# Altium PCB Left-PCB-v1.0.PcbDoc (part 2 of 2)
Units mil, origin at the board's own origin, x right, y up, seen from the top; angles counter-clockwise.
Board outline 1062.99 x 944.88 mil, 4 copper layers (Top Layer, GND, PWR, Bottom Layer), stack 45.118 mil thick; 85 components, 60 nets, 287 pads, 140 vias.
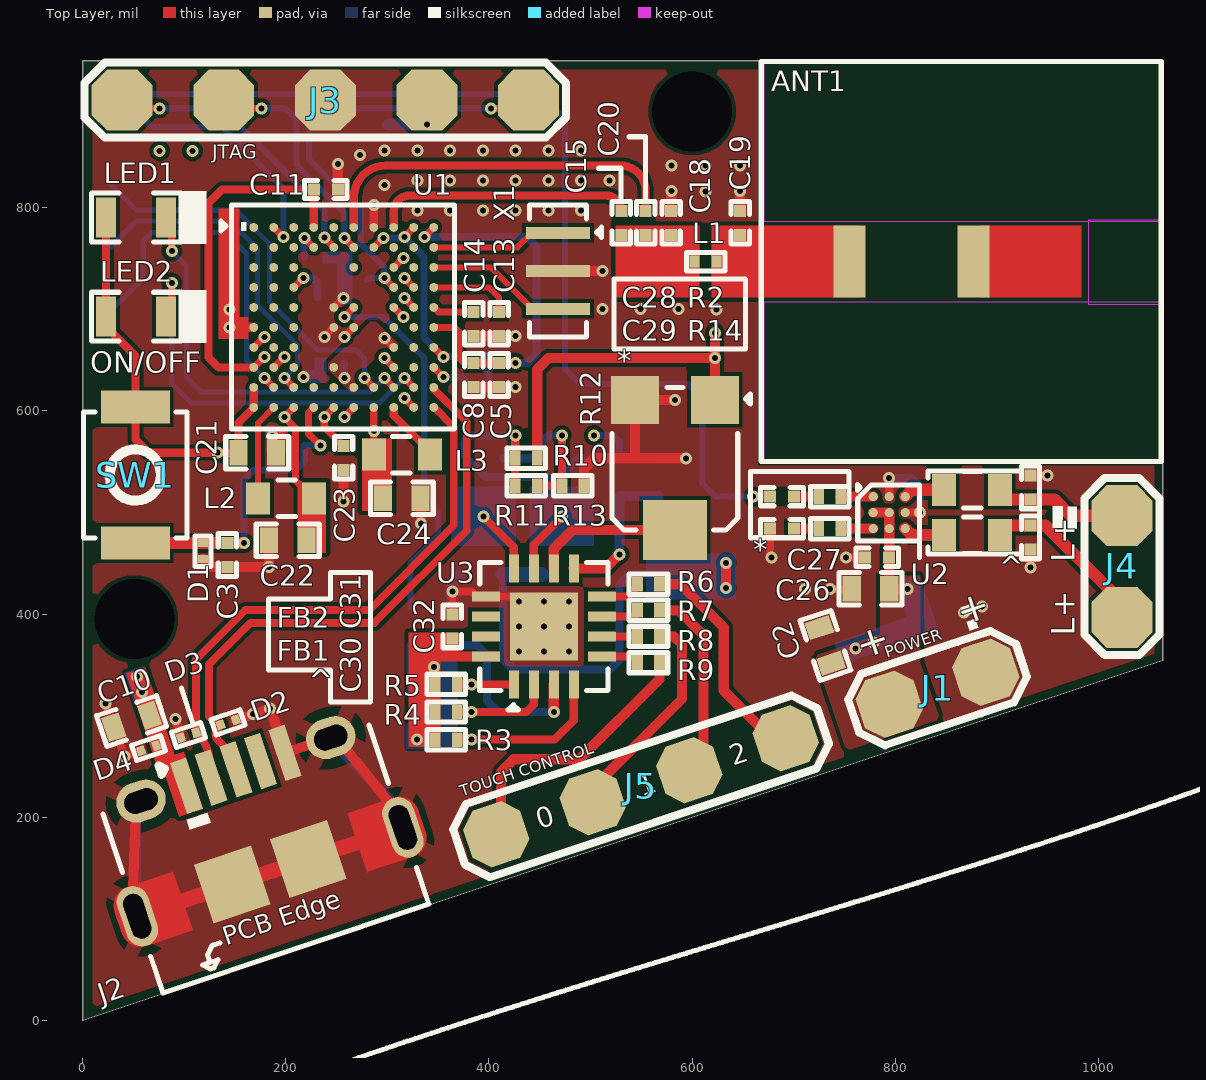
[diagram p0: Top Layer view]

## Via types
v1: diameter 11.81, hole 5.91, Top Layer to Bottom Layer, tented both sides, 140 vias

## Nets (pads, with @x,y where several pads share a name; then routed paths per layer and width w, separated by ;. In a path a pad name is that pad's centre, name@x,y a point inside that pad or via, vN(x,y) a via of type N, cw(c..) or ccw(c..) an arc to the next point about the centre after c; other vN are vias at no path point) (continued)
EASY_TUNE: (continued)
  Bottom Layer w6: v1(257.62,692.5) 295.98,692.5 336.36,652.13 336.36,513.85 350,500.21 350,477.51 323,450.51 SB6.1
GND: C1.2 C2.2 C3.1 C4.1 C5.1 C6.1 C7.2 C8.1 C9.2 C10.2 C11.1 C12.2 C13.2 C14.2 C16.2 C17.1 C18.1 C19.1 C21.1 C22.1 C23.1 C24.1 C25.1 C26.1 C27.1 C29.1 C30.1 C31.1 C32.2 D1.1 D2.1 D3.1 D4.1 J1.2 J2.5 J2.MP1 J2.MP2 J2.S1 J2.S2 J2.S3 J2.S4 J3.3 R1.2 R12.3 R13.2 SB2.1 SB4.1 SB10.2 SB14.2 U1.A7 U1.E5 U1.F5 U1.F6 U2.A2 U2.B3 U3.13 U3.17 X1.2 | length 2266.1
  Top Layer w6: U1.F5 U1.F5@247.32,682.48 ; U1.E5@247.32,701.6 U1.E5
  Top Layer w7: v1(237.93,672.82) U1.F5 ; U1.E5 v1(256.7,711.26) ; v1(257.62,672.82) U1.F6
  Top Layer w8: v1(22.63,312.04) 27.77,296.69 C10.2 34.31,280.95 v1(41.3,260.04) D4.1@57.75,265.12 ; v1(91.48,296.99) D3.1 ; U1.A7 v1(286.69,802.88) ; C32.2 v1(364,422.33) 383.13,422.33 388.06,417.41 U3.13 424.47,417.41 v1(429.39,412.49) ; C29.1 676.69,458.25 678.02,456.91 v1(678.02,455.88) ; v1(735.48,424.88) C26.1 ; v1(751.62,455.88) C27.1 ; U2.A2 v1(794,534.15) ; U2.B3 v1(824.31,499.88) ; J1.2@878.77,353.12 J1.2
  Top Layer w10: J2.S4 49.31,116.67 52.93,214.4 J2.S1 ; D1.1 126.4,446.4 C3.1 v1(183.5,446.4) C22.1 ; D2.1 v1(167.65,301.46) v1(184.53,306.91) ; v1@185.01,306.67 192.63,283.9 J2.5 202.57,264.47 239.61,276.87 J2.S2 248.94,279.99 310.65,204.11 J2.S3 ; C11.1 v1(251.25,842.88) ; v1(257,510.88) C23.1 ; v1(333.12,488.97) C24.1@333.12,514.04 ; C8.1 C5.1 v1(426,623.54) ; C14.2 C13.2 v1(426,673.93) ; X1.2 v1(512,737.88) ; R13.2 493.49,543.14 503.73,553.38 543.63,553.38 ; C18.1 579.48,797.22 579.48,816.19 v1(579.68,816.39) ; v1(583,610.86) R12.3 543.63,553.38 ; v1(594,553.38) 543.63,553.38 ; C19.1 v1(647.28,816.39) ; v1(933,445.88) C30.1 ; C31.1 v1(949.99,536.5)
  Top Layer w15: J2.S4 J2.MP1 J2.MP2 J2.S3
  Bottom Layer w7: v1(187.21,575.26) R1.2 ; C1.2 C17.1
  Bottom Layer w8: v1(794,534.15) 815.73,534.15 824.31,525.57 v1(824.31,499.88)
  Bottom Layer w10: J2.S1 52.67,211.04 52.67,103.99 J2.S4 J2.S3 315.34,204.95 244.27,276.01 J2.S2 ; v1(251.25,842.88) v1@251.25,843.37 ; SB2.1 v1(594,553.38)
  Bottom Layer w12: SB4.1 364,407.88 v1(364,422.33) 364,431.58 SB10.2@371.5,439.08
  other v1: 429.39,363.28 454,363.28 478.61,363.28 429.39,387.88 454,387.88 478.61,387.88 867.51,401.74 885.37,407.42 454,412.49 478.61,412.49 710.87,424.88 217.3,633.47 549.25,700.32 586.65,700.17 624.05,700.01 511.84,700.48 329.62,797.07 361.84,797.07 394.06,797.07 426.28,797.07 458.51,797.07 490.73,797.07 613.08,816.19 297.39,822.24 329.62,826.88 361.84,826.88 394.06,826.88 426.28,826.88 458.51,826.88 490.73,826.88 518.85,826.88 579.68,841.62 613.28,841.62 647.28,841.62 273.04,851.72 297.39,856.36 329.62,856.36 361.84,856.36 394.06,856.36 426.28,856.36 458.51,856.36 490.73,856.36
LDO31_VO: C9.1 C23.2 C25.2 J3.2 U1.C8 U1.D3 U1.H8 U1.K5 | length 158.2
  Top Layer w7: U1.D3 v1(217.33,730.95) ; U1.K5 v1(237.93,594.08) 237.93,584.39 254.22,568.1 254.6,568.1 256.63,566.07 C23.2@256.63,565.69 ; v1(296.99,652.21) U1.H8 ; U1.C8 v1(315.75,750.63)
  Bottom Layer w7: v1(217.33,730.95) 226.9,730.95 231,726.85 C9.1
  Bottom Layer w12: C25.2 v1(339,881.88)
LED1: LED1.2 U1.J8 | length 385.1
  Top Layer w7: LED1.2 87.83,784.81 v1(87.83,757.16) ; v1(296.99,632.52) U1.J8
  Bottom Layer w5: v1(87.83,757.16) 102.37,742.62 102.37,633.23 116.96,618.63 283.1,618.63 v1(296.99,632.52)
LED2: LED2.2 U1.J9 | length 394.6
  Top Layer w7: LED2.2 87.83,698.33 v1(87.83,725.98) ; v1(316.67,632.52) U1.J9
  Bottom Layer w5: v1(87.83,725.98) 87.83,627.05 107,607.88 292.03,607.88 v1(316.67,632.52)
MFB: C3.2 D1.2 R1.1 SW1.2 U1.K4 | length 311.8
  Top Layer w7: U1.K4 222.52,598.35 222.52,577.45 v1(234.1,565.88)
  Top Layer w12: SW1.2 C3.2 v1(158.93,470.02)
  Bottom Layer w7: v1(158.93,470.02) 158.93,532.44 168.27,541.77 209.34,541.77 218.25,550.68 R1.1 v1(234.1,565.88)
NetANT1_1: ANT1.1 C19.2 L1.2
NetC12_1: C12.1 U1.B4 | length 32.7
  Top Layer w7: v1(218.25,770.32) U1.B4
  Bottom Layer w7: C12.1 v1(218.25,770.32)
NetC13_1: C13.1 U1.D10 | length 82.3
  Top Layer w6: U1.D10 399.76,721.57 410,711.33 C13.1
NetC14_1: C14.1 U1.E10 | length 41.1
  Top Layer w7: U1.E10 346.19,701.88 350.52,697.55 C14.1
NetC15_2: C15.2 C18.2 C20.2 L1.1
NetC28_2: C28.2 R2.1 | length 24.3
  Top Layer w10: C28.2 R2.1
NetC29_2: C29.2 R14.1 | length 24.3
  Top Layer w10: C29.2 R14.1
NetFB1_1: FB1.1 U2.C3 | length 40.6
  Top Layer w12: U2.C3 816.1,477.79 FB1.1
NetFB2_1: FB2.1 U2.A3 | length 40.8
  Top Layer w12: U2.A3 816.46,522.34 FB2.1
NetP1_1: P1.1 U1.J7 | length 387.3
  Top Layer w7: v1(277.3,632.52) U1.J7
  Bottom Layer w5: P1.1 53.07,797.5 151.06,797.5 183.91,764.66 183.91,707.62 231.64,659.88 269.07,659.88 277.3,651.65 v1(277.3,632.52)
NetP2_1: P2.1 U1.J3 | length 329.6
  Top Layer w7: v1(198.56,632.52) U1.J3
  Bottom Layer w5: P2.1 53.07,786.95 145.04,786.95 172.33,759.66 172.33,703.94 211.74,664.53 211.74,645.7 v1(198.56,632.52)
NetP3_1: P3.1 U1.J2 | length 339.4
  Top Layer w7: v1(178.88,632.52) U1.J2
  Bottom Layer w5: P3.1 60.08,731.28 60.08,767.71 68.09,775.72 140.6,775.72 161.35,754.98 161.35,650.06 v1(178.88,632.52)
NetR2_2: R2.2 U2.A1 | length 31.9
  Top Layer w10: R2.2 U2.A1
NetR6_1: R6.1 U3.8 | length 41.2
  Top Layer w8: U3.8 536.11,417.41 546.17,427.47 R6.1
NetR7_2: R7.2 U3.7 | length 38.7
  Top Layer w8: U3.7 542.14,397.73 546.17,401.76 R7.2
NetR8_2: R8.2 U3.6 | length 35.1
  Top Layer w8: U3.6 R8.2
NetR9_2: R9.2 U3.5 | length 38.8
  Top Layer w8: U3.5 542.06,358.36 546.17,354.24 R9.2
NetR14_2: R14.2 U2.C1 | length 31.9
  Top Layer w10: R14.2 U2.C1
NetSB1_2: SB1.2 SB2.2 SB5.2 U3.9 | length 185.1
  Top Layer w10: U3.9 514.61,444.97 v1(528.53,458.88)
  Bottom Layer w10: v1(528.53,458.88) SB5.2 SB2.2 SB1.2@567,478
NetSB3_2: SB3.2 SB4.2 SB6.2 U3.3 | length 269.2
  Top Layer w10: v1(463.84,303.61) U3.3
  Bottom Layer w8: SB3.2 SB6.2 SB4.2 388.63,369.38 398.28,359.73 398.28,314.67 409.33,303.61 v1(463.84,303.61)
OUT_0: R3.1 U1.E8 U3.4 | length 701.1
  Top Layer w7: U1.E8 v1(315.75,692.5)
  Top Layer w8: R3.1 464.49,276.43 483.53,295.47 U3.4
  PWR w7: v1(315.75,692.5) 400.5,692.5 411,682 411,466.89 383,438.89 383,353.88 367,337.88 367,292.43 v1(383,276.43)
OUT_1: R4.1 U1.D9 U3.2 | length 696
  Top Layer w7: v1(316.67,730.95) U1.D9
  Top Layer w8: R4.1 436.73,303.61 444.16,311.04 U3.2
  PWR w7: v1(316.67,730.95) 433.27,730.95 457.3,706.91 457.3,470.64 413.93,427.26 413.93,334.55 v1(383,303.61)
OUT_2: R5.1 U1.E9 U3.1 | length 588.9
  Top Layer w7: v1(316.67,711.26) U1.E9
  Top Layer w8: R5.1 U3.1
  PWR w7: v1(316.67,711.26) 421.84,711.26 444,689.1 444,479.02 399.48,434.49 399.48,347.27 v1(383,330.8)
OUT_L+: C30.2 FB1.2 J4.1 | length 172.6
  Top Layer w12: FB1.2 902.89,481.53 908.7,487.34 947.66,487.34 1010.49,424.51 1010.49,409.4 J4.1
OUT_L-: C31.2 FB2.2 J4.2 | length 132.8
  Top Layer w12: FB2.2 902.89,518.69 908.7,512.88 956.58,512.88 972.58,496.88 J4.2
PA1OP: C20.1 U1.A6 | length 368.4
  Top Layer w8: U1.A6 267,809.88 cw(c298.74,809.88) 298.74,841.62 529.05,841.62 cw(c529.05,816.39) 554.28,816.39 C20.1
RST_N: C16.1 J3.1 U1.D8 | length 441.6
  Top Layer w6: v1(402,897.88) 431,897.88 J3.1
  Top Layer w7: v1(296.99,730.95) U1.D8
  Bottom Layer w6: C16.1 282.07,730.95 v1(296.99,730.95) 296.99,741.49 273.82,764.66 273.82,797.07 222.93,847.95 222.93,886.85 233.97,897.88 v1(402,897.88)
RTX: C15.1 U1.A8 | length 257.3
  Top Layer w8: U1.A8 306.37,796.62 cw(c321.72,796.62) 321.72,811.98 515.32,811.98 cw(c515.32,797.02) C15.1 C15.1@530.38,797.02
SINGLE_BUTTON: SB5.1 U1.H2 | length 907.7
  Top Layer w7: U1.H2 v1(198.59,653.15)
  PWR w7: v1(198.59,653.15) 198.59,744.03 177.02,765.6 177.02,872.12 203.33,898.42 362.5,898.42 382.6,878.32 458.29,878.32 474.55,862.06 474.55,604.84 v1(503.5,575.88)
  Bottom Layer w7: v1(503.5,575.88) 521.82,575.88 528.53,569.17 SB5.1
SYS_PWR: C21.2 LED1.1 LED2.1 SW1.1 U1.J1 U1.K1 U1.K6 U1.K9 | length 434.3
  Top Layer w7: v1(257.62,594.08) U1.K6 ; v1(316.67,612.84) U1.K9
  Top Layer w8: LED1.1 LED2.1 23.27,682.97 52,654.24 SW1.1 52,571.79 64.91,558.88 v1(133,558.88) C21.2 153.5,588.38 U1.K1 U1.J1
USB_D_N: D3.2 J2.2 U1.K10 | length 548.5
  Top Layer w7.62: D3.2 111.76,299.77 111.76,355.69 160.05,403.98 282.07,403.98 365.47,487.38 365.47,584.01 U1.K10@346.02,603.46 ; D3.2@115.02,280.27 cw(c85.2,253.33) 125.16,257.63 J2.2
USB_D_P: D2.2 J2.3 U1.J10 | length 575.2
  Top Layer w7.62: D2.2@133.29,287.19 ccw(c138.89,281.59) 130.98,282.01 130.98,281.89 ccw(c138.59,281.63) 130.97,281.46 130.98,281.17 ccw(c138.89,281.59) 131.52,278.7 cw(c85.2,253.33) 132.33,277.15 ccw(c138.89,281.59) 133.29,275.99 141.3,267.98 J2.3 ; D2.2 135.84,291.24 134.42,292.66 131.49,292.66 124.38,299.77 124.38,350.46 165.28,391.36 287.29,391.36 378.09,482.15 378.09,589.24 345.94,621.39 345.94,622.94 U1.J10
V_USB: C10.1 D4.2 J2.1 U1.F1 | length 64.1
  Top Layer w8: v1(144.5,682.2) U1.F1
  Top Layer w10: v1(53.41,338.5) v1(58.55,323.33) C10.1
  other v1: 144.5,699.88
VBAT: C2.1 C26.2 C27.2 C32.1 J1.1 R3.2 R4.2 R5.2 R10.1 R12.1 SB1.1 SB3.1 SB7.2 SB11.2 U1.G1 U2.B1 U2.B2 U2.C2 U3.16 | length 843
  Top Layer w7: U1.G1@169.02,662.51 U1.G1 v1(178.9,672.84)
  Top Layer w10: R10.1 447.58,640.87 458.92,652.21 v1(622.37,652.21) ; R12.1 v1(622.37,652.21) ; v1(622.37,676.81) v1(622.37,652.21) ; v1(633.42,425.77) v1(633.42,450.37) ; U2.B1 U2.B2 U2.C2 C27.2 794,424.99 C26.2 v1(812.08,424.88)
  Bottom Layer w8: SB7.2 414,355.39 424.02,345.37 519.31,345.37 528.53,354.58 528.53,429.08 538.52,439.08 SB1.1
  Bottom Layer w15: SB7.2 SB11.2
  other v1: 329.2,276.43 345.87,347.88 760.64,366.34 778.49,372.02 76,855.88 108.22,855.88
VCC_RF: C5.2 C8.2 U1.A10 U1.F10 | length 368.3
  Top Layer w4: v1@336,770.88 v1(336.36,771.24)
  Top Layer w6: C8.2@383.54,648.62 C8.2
  Top Layer w7: v1(336.36,771.24) U1.A10 ; U1.F10 365.83,682.2 370.41,677.62 370.41,652.14 373.92,648.62 C8.2@383.54,648.62
  Top Layer w8: C8.2 C5.2 v1(426,647.16)
  Bottom Layer w8: v1(336.36,771.24) 437.4,771.24 446.85,761.79 446.85,655.74 438.27,647.16 v1(426,647.16)
XO_N: U1.C10 X1.3 | length 139.3
  Top Layer w6: U1.C10 401.91,741.25 439.5,703.66 439.5,703.39 442.41,700.48 X1.3
XO_P: U1.B10 X1.1 | length 128.2
  Top Layer w6: U1.B10 428.06,760.94 442.41,775.28 X1.1
pads on no net: ANT1.2 J2.4 U1.A1 U1.A3 U1.A5 U1.B1 U1.B2 U1.B3 U1.B8 U1.B9 U1.C1 U1.C2 U1.C3 U1.C6 U1.C9 U1.D1 U1.D2 U1.E1 U1.E2 U1.E3 U1.F2 U1.F3 U1.F8 U1.F9 U1.G2 U1.G3 U1.G9 U1.H3 U1.H9 U1.J4 U1.J5 U3.14 U3.15

## Polygon pours and split planes (outlines as drawn)
1V5 on PWR "1V5_L03_P003" (solid, pour order 3): 347.12,424 399,475.88 399,680.88 349,680.88 349,644.88 372,644.88 372,552.88 307.12,488 141.88,488 118,511.88 118,577.88 127,586.88 205,586.88 205,599.88 110,599.88 95,584.88 95,494 165,424
SYS_PWR on PWR "SYS_PWR_L03_P001" (solid, pour order 1): 199,563.91 199,534.88 290,534.88 308,552.88 308,603.88 266,603.88 266,586.88 250,586.88 250,621.88 365,621.88 365,557.88 302.12,495 143.88,495 124,514.88 124,574.63 131.25,581.88 173.82,581.88 173.82,563.91
VBAT on PWR "VBAT_L03_P006" (solid, remove dead copper, pour order 6): 664.35,937.88 664.35,546.01 1055,546.01 1055,361.22 10,12.88 10,937.88
LDO31_VO on PWR "LDO31_VO_L03_P005" (solid, pour order 5): 241,832.88 276,832.88 276,798.88 282,792.88 286,792.88 286,760.41 330,760.41 330,742.88 285,742.88 285,658.88 319,658.88 319,643.88 250.79,643.88 245,638.1 245,586.88 228.38,586.88 228.38,643.88 209,643.88 209,758.88 267.52,758.88 267.52,781.44 188,781.44 188,866.88 211.07,889.95 348.58,889.95 348.58,866.27 250.39,866.27 241,856.88
V_USB on PWR "V_USB_L03_P000" (solid, pour order 0): 10,270.62 10,710.88 153,710.88 153,669.88 134.5,669.88 134.5,604.88 104,604.88 87.83,588.72 87.83,491.17 155,424 155,270.62
1V8 on PWR "1V8_L03_P002" (solid, pour order 2): 274,596.88 300,596.88 300,556.88 285,541.88 209,541.88 209,604.88 143,604.88 143,661.88 188,661.88 188,644.88 165,644.88 165,621.88 224,621.88 224,581.88 274,581.88
1V2 on PWR "1V2_L03_P008" (solid, pour order 8): 290,663.88 290,715 305,715 305,680.88 343,680.88 343,640.1 365,640.1 365,626.88 327,626.88 327,663.88
GND on Top Layer "GND_L01_P007" (solid, remove dead copper, pour order 7): 664.35,935.88 664.35,546.01 1055,546.01 1055,361.22 10,12.88 10,935.88
1V2 on Top Layer "1V2_L01_P009" (solid, pour order 9): 242,646.88 242,640.34 252.44,629.89 266.16,616.18 273.93,623.95 267,630.88 299.5,663.38 305.79,657.09 312.79,664.09 289,687.88 283,687.88
VBAT on Top Layer "VBAT_L01_P004" (solid, pour order 4): 785.11,380.3 720.56,359.31 751.77,265.47 844.02,296.52 824.75,352.29 824.31,437.88 785.11,437.88
GND on GND "GND_L02_P010" (solid, pour order 10): 664.35,934.88 664.35,546.01 1055,546.01 1055,361.22 10,12.88 10,934.88
VBAT on Bottom Layer "VBAT_L04_P011" (solid, pour order 11): 152,808.8 152,848.76 131.56,869.2 64.3,869.2 53,880.5 53,909.29 63.14,919.43 459.09,919.43 528.77,849.75 528.77,635.88 640,635.88 640,799.29 570.33,799.29 570.25,799.2 570.25,916.64 549.01,937.88 10,937.88 10,849.88 41,849.88 54.69,836.19 54.69,808.8
GND on Bottom Layer "GND_L04_P012" (solid, pour order 12): 664.35,934.88 664.35,546.01 1055,546.01 1055,361.22 10,12.88 10,934.88

## Other copper
Top Layer:
  rectangle net V_USB: 134,670.88 163.12,692.5
  region net V_USB: 75.53,243.38 94.61,249.76 61.7,348.11 42.62,341.73
  rectangle net V_USB: 134,677.76 170.13,686.87
  rectangle net VBAT: 321.1,269.15 352.58,285.11
  rectangle net V_USB: 134,670.88 154.72,799.3
  rectangle net 1V5: 211.5,460.38 239.84,529.79
  region net NetC15_2: 607.38,782.32 524.38,782.32 524.38,711.45 607.38,711.45
  rectangle net NetANT1_1: 619.19,711.45 762.56,782.32
  rectangle net GND: 181.5,546.38 199.5,581.59
  region net V_USB: 95.07,200.48 109.48,205.3 72.49,315.87 58.07,311.04
  region net V_USB: 98.15,201.51 118.67,208.38 99.79,264.82 79.27,257.95
  rectangle net 1V8: 274.87,501.54 304.74,572.63
  rectangle net VBAT: 341.95,353.43 410.69,363.28
  rectangle net VBAT: 339,353.43 369.91,381.98
  rectangle net VBAT: 320.77,269.15 352.58,381.98
Bottom Layer:
  region net VBAT: 819.05,375.96 842.76,384.42 823.15,439.36 799.43,430.89
  region net VBAT: 747.31,349.68 842.76,384.42 834.9,406.04 739.44,371.29
  region net V_USB: 51.82,309.15 72.16,315.96 60.96,349.46 40.61,342.66
  rectangle net VBAT: 317.68,266.53 369,292.5
  rectangle net VBAT: 554.5,414.55 643.39,459.88
  rectangle net V_USB: 134,670.88 154.72,710.74
  rectangle net GND: 217,627.34 239.9,640.04
  rectangle net GND: 228.09,627.34 239.9,652.79
  rectangle net VBAT: 339.52,266.53 369,354.55
  rectangle net GND: 235.97,744.98 265.72,756.79
  rectangle net GND: 250.47,704.94 265.72,756.79
  rectangle net GND: 180.7,558.6 201.91,581.43
  rectangle net CFG0: 362.5,467.08 426.5,525.38
  rectangle net CFG1: 439.83,467.08 503.63,525.38

## Silkscreen, mask and mechanical layers (free items; w line width, h text height)
Top Overlay:
  drawing of 1398 lines, arcs and shapes, not listed
  text "JTAG" at 127.68,843.06 h23.62
  text "*" at 526.22,631.93 h35.43
  text "ON/OFF" at 7.52,630.53 h35.43
  text "TRANSDUCER" at 1300.49,465.45 h45 r90
  text "L+" at 984.5,450.94 h39.37 r90
  text "*" at 660.39,446.2 h35.43
  text "^" at 902.54,429.97 h35.43
  text "+" at 868.43,378.76 h49.21 r18.4
  text "L+" at 984.5,378.94 h39.37 r90
  text "POWER" at 793,353.33 h19.68 r18.4
  text "+" at 769.45,345.68 h49.21 r18.4
  text "^" at 222.54,317.97 h35.43
  text "2" at 640.62,250.75 h19.68 r18.4
  text "1" at 550.28,220.43 h19.68 r18.4
  text "TOUCH CONTROL" at 374.91,216.14 h19.68 r18.4
  text "0" at 449.92,188.13 h19.68 r18.4
  text "BATTERY" at 3239.87,93.87 h45
Bottom Overlay:
  lines w5: 359,581.88 412,581.88 412,567.88 ; 378.5,356.88 391.94,343.45
  text "RTS" at 126.57,807.11 h35.43
  text "TXD" at 121.57,749.53 h35.43
  text "RXD" at 123.52,686.88 h35.43
  text "Rev-v1.0 (LEFT)" at 910.98,326.41 h39.37 r18
Board Outline:
  the board outline again, w5
Fabrication:
  drawing of 295 lines, arcs and shapes, not listed
  text "Layer" at 4397.58,1223 h60
  text "Name" at 4807.49,1223 h60
  text "Material" at 5737.23,1223 h60
  text "Thickness" at 6597,1223 h60
  text "Constant" at 7246.84,1223 h60
  text "Board Layer Stack" at 7816.7,1223 h60
  text "Top Overlay" at 4807.49,1103 h60
  text "Top Solder" at 4807.49,983 h60
  text "Solder Resist" at 5737.23,983 h60
  text "1.20mil" at 6597,983 h60
  text "3.8" at 7246.84,983 h60
  text "1" at 4397.58,863 h60
  text "Top Layer" at 4807.49,863 h60
  text "1.38mil" at 6597,863 h60
  text "Dielectric 2" at 4807.49,743 h60
  text "PP-006" at 5737.23,743 h60
  text "7.99mil" at 6597,743 h60
  text "4.4" at 7246.84,743 h60
  text "2" at 4397.58,623 h60
  text "GND" at 4807.49,623 h60
  text "CF-004" at 5737.23,623 h60
  text "1.38mil" at 6597,623 h60
  text "Dielectric 1" at 4807.49,503 h60
  text "FR-4" at 5737.23,503 h60
  text "23.62mil" at 6597,503 h60
  text "4.6" at 7246.84,503 h60
  text "3" at 4397.58,383 h60
  text "PWR" at 4807.49,383 h60
  text "CF-004" at 5737.23,383 h60
  text "1.38mil" at 6597,383 h60
  text "Dielectric 3" at 4807.49,263 h60
  text "PP-006" at 5737.23,263 h60
  text "7.99mil" at 6597,263 h60
  text "4.4" at 7246.84,263 h60
  text "4" at 4397.58,143 h60
  text "Bottom Layer" at 4807.49,143 h60
  text "1.38mil" at 6597,143 h60
  text "Bottom Solder" at 4807.49,23 h60
  text "Solder Resist" at 5737.23,23 h60
  text "1.20mil" at 6597,23 h60
  text "3.8" at 7246.84,23 h60
  text "Bottom Overlay" at 4807.49,-97 h60
  text "Total board thickness:" at 4397.58,-217 h60
  text "47.52mil" at 6597,-217 h60
Drill Drawing:
  circle w10: c-301.93,2107.39 r33.33
  lines w10: -335.26,1940.72 -318.59,1940.72 -301.93,1924.05 -285.26,1940.72 -268.59,1940.72 -285.26,1957.39 -268.59,1974.05 -285.26,1974.05 -301.93,1990.72 -318.59,1974.05 -335.26,1974.05 -318.59,1957.39 -335.26,1940.72 ; -335.26,2224.05 -268.59,2224.05 -268.59,2290.72 -335.26,2290.72 -335.26,2224.05 ; -335.26,2440.72 -268.59,2440.72 -301.93,2374.05 -335.26,2440.72
  lines w15: -395.05,1879.05 9562.17,1879.05 ; -395.05,2479.05 9562.17,2479.05 ; 155.83,1729.05 155.83,2629.05 ; 745.67,1729.05 745.67,2629.05 ; 1845.35,1729.05 1845.35,2629.05 ; 2351.23,1729.05 2351.23,2629.05 ; 3085.03,1729.05 3085.03,2629.05 ; 4584.58,1729.05 4584.58,2629.05 ; 5174.43,1729.05 5174.43,2629.05 ; 5920.22,1729.05 5920.22,2629.05 ; 7059.89,1729.05 7059.89,2629.05 ; 8159.57,1729.05 8159.57,2629.05 ; -395.05,1729.05 9562.17,1729.05 9562.17,2629.05 -395.05,2629.05 -395.05,1729.05
  text "Symbol" at -305.05,2524.05 h72
  text "Count" at 200.83,2524.05 h72
  text "Hole Size" at 790.67,2524.05 h72
  text "Plated" at 1890.35,2524.05 h72
  text "Hole Type" at 2396.23,2524.05 h72
  text "Drill Layer Pair" at 3130.03,2524.05 h72
  text "Via/Pad" at 4629.58,2524.05 h72
  text "Pad Shape" at 5219.43,2524.05 h72
  text "Template" at 5965.22,2524.05 h72
  text "Hole Length" at 7104.89,2524.05 h72
  text "Routed Path Length" at 8204.57,2524.05 h72
  text "140" at 200.83,2374.05 h60
  text "5.91mil (0.150mm)" at 790.67,2374.05 h60
  text "PTH" at 1890.35,2374.05 h60
  text "Round" at 2396.23,2374.05 h60
  text "Top Layer - Bottom Layer" at 3130.03,2374.05 h60
  text "Via" at 4629.58,2374.05 h60
  text "Rounded" at 5219.43,2374.05 h60
  text "v30h15" at 5965.22,2374.05 h60
  text "-" at 7104.89,2374.05 h60
  text "-" at 8204.57,2374.05 h60
  text "2" at 200.83,2224.05 h60
  text "19.69mil (0.500mm)" at 790.67,2224.05 h60
  text "PTH" at 1890.35,2224.05 h60
  text "Slot" at 2396.23,2224.05 h60
  text "Top Layer - Bottom Layer" at 3130.03,2224.05 h60
  text "Pad" at 4629.58,2224.05 h60
  text "Rounded" at 5219.43,2224.05 h60
  text "r80_155h50_115r100" at 5965.22,2224.05 h60
  text "45.28mil (1.150mm)" at 7104.89,2224.05 h60
  text "25.59mil (0.650mm)" at 8204.57,2224.05 h60
  text "2" at 200.83,2074.05 h60
  text "21.65mil (0.550mm)" at 790.67,2074.05 h60
  text "PTH" at 1890.35,2074.05 h60
  text "Slot" at 2396.23,2074.05 h60
  text "Top Layer - Bottom Layer" at 3130.03,2074.05 h60
  text "Pad" at 4629.58,2074.05 h60
  text "Rounded" at 5219.43,2074.05 h60
  text "r100_125h55_85r100" at 5965.22,2074.05 h60
  text "33.47mil (0.850mm)" at 7104.89,2074.05 h60
  text "11.81mil (0.300mm)" at 8204.57,2074.05 h60
  text "2" at 200.83,1924.05 h60
  text "78.74mil (2.000mm)" at 790.67,1924.05 h60
  text "NPTH" at 1890.35,1924.05 h60
  text "Round" at 2396.23,1924.05 h60
  text "Top Layer - Bottom Layer" at 3130.03,1924.05 h60
  text "Pad" at 4629.58,1924.05 h60
  text "Rounded" at 5219.43,1924.05 h60
  text "c0hn200" at 5965.22,1924.05 h60
  text "-" at 7104.89,1924.05 h60
  text "-" at 8204.57,1924.05 h60
  text "146 Total" at 200.83,1774.05 h60
  text "Slot definitions :" at -305.05,1629.08 h60
  text "Routed Path Length" at 727.64,1629.08 h60
  text "= Calculated from tool start centre position to tool end centre position." at 1830.31,1629.08 h60
  text "Hole Length" at 727.64,1529.1 h60
  text "= Routed Path Length + Tool Size = Slot length as defined in the PCB layout" at 1420.44,1529.1 h60

## Dimensions
1062.99,944.88 to 0,944.88 on Dimensions
1062.99,354.33 to 0,0 on Dimensions
1062.99,354.33 to 1062.99,944.88 on Dimensions

## Text inside footprints (layer, text, board x,y; h text height)
J2: Top Overlay "PCB Edge" at 143.43,67.54 h31.5 r18.5